# Altium PCB ZYNQ_BOARD.PcbDoc (part 6 of 9)
Units mm, origin at the board's own origin, x right, y up, seen from the top; angles counter-clockwise.
Board outline 120 x 66 mm, 10 copper layers (Top Layer, Internal Plane 1 (GND), Middle Layer 1, Middle Layer 2, Internal Plane 2 (+1.0V), Middle Layer 3, Middle Layer 4, Middle Layer 5 (PWR), Internal Plane 3 (GND), Bottom Layer), stack 0.982 mm thick; 333 components, 331 nets, 1511 pads, 1077 vias.
Unrouted connection lines stored in the file: 30.
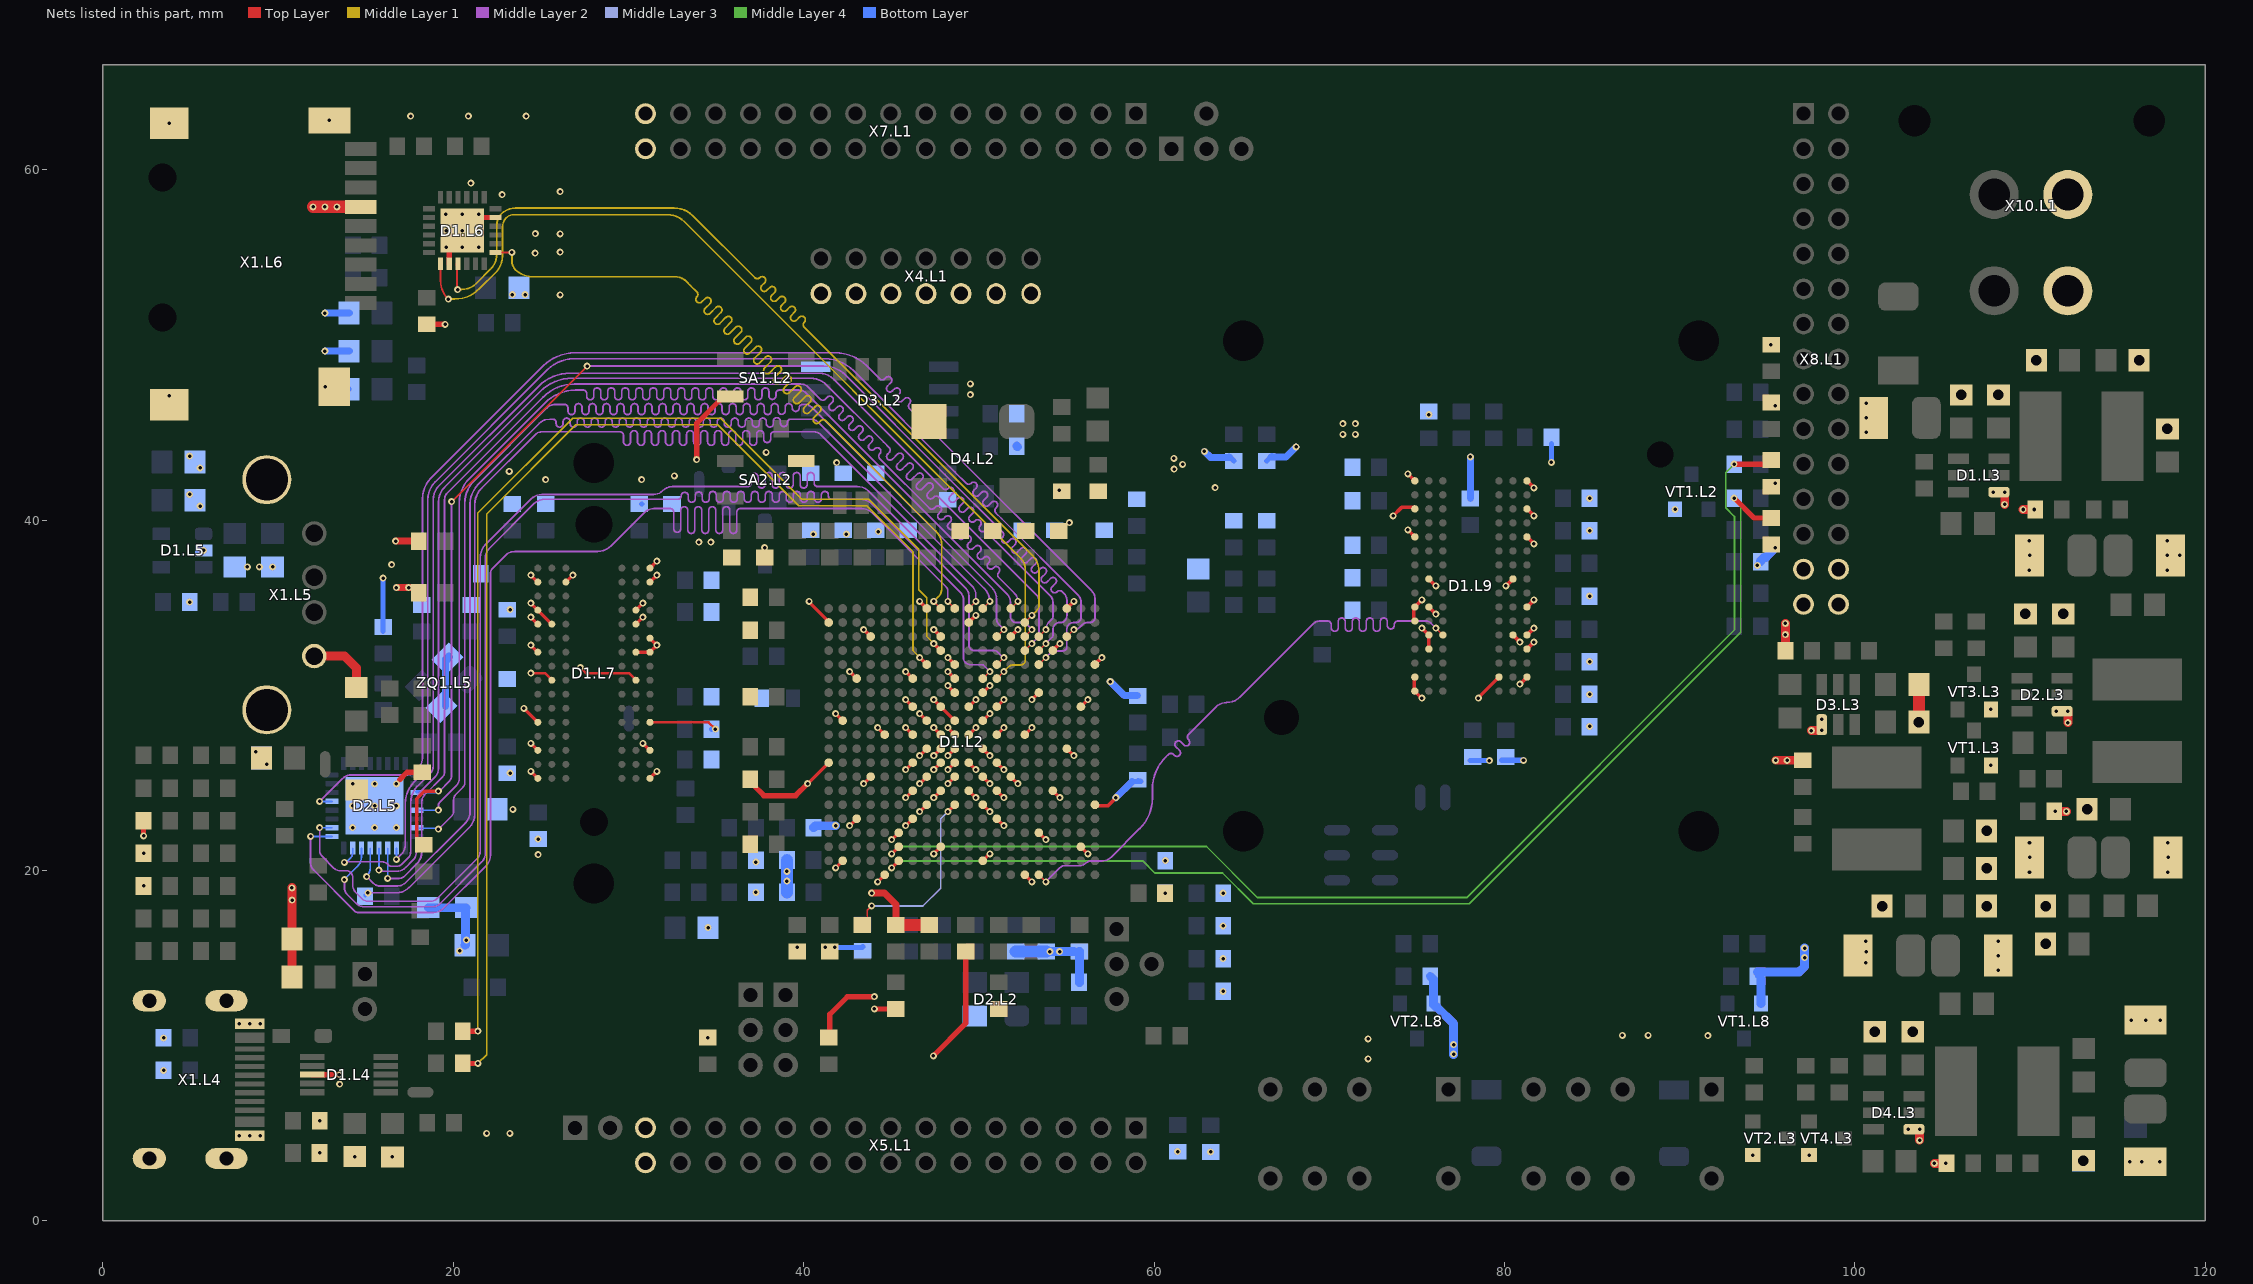
[diagram p14: the nets of this part, all layers, seen from the top]

## Via types
v1: diameter 0.4, hole 0.2, Top Layer to Bottom Layer, 1059 vias
v2: diameter 0.9, hole 0.6, Top Layer to Bottom Layer, 18 vias

## Nets (pads, with @x,y where several pads share a name; then routed paths per layer and width w, separated by ;. In a path a pad name is that pad's centre, name@x,y a point inside that pad or via, vN(x,y) a via of type N, cw(c..) or ccw(c..) an arc to the next point about the centre after c; other vN are vias at no path point) (continued)
FPGA_SD_CARD.SD_D1: D1.L2.A9 D1.L6.7 | length 54.1
  Top Layer w0.1: D1.L6.7@22.41,55.28 v1(23.34,55.28) ; v1(47.42,35.36) D1.L2.A9@47.82,34.96
  Middle Layer 1 w0.1: 23.34,54.774 ccw(c24.008,54.774) 23.536,54.302 ccw(c24.507,55.274) 24.507,53.9 32.626,53.9 cw(c32.626,52.925) 33.316,53.614 33.316,53.614 33.539,53.391 33.9,53.03 cw(c33.759,52.889) 33.9,52.747 ccw(c34.041,52.606) 33.9,52.464 ccw(c34.041,52.606) 34.183,52.464 34.371,52.652 cw(c34.512,52.511) 34.654,52.652 cw(c34.512,52.511) 34.654,52.369 34.372,52.087 ccw(c34.513,51.946) 34.372,51.804 ccw(c34.513,51.946) 34.654,51.804 34.991,52.141 cw(c35.133,52) 35.274,52.141 cw(c35.133,52) 35.274,51.859 34.937,51.522 ccw(c35.079,51.38) 34.937,51.239 ccw(c35.079,51.38) 35.22,51.239 35.557,51.576 cw(c35.699,51.434) 35.84,51.576 cw(c35.699,51.434) 35.84,51.293 35.503,50.956 ccw(c35.644,50.815) 35.503,50.673 ccw(c35.644,50.815) 35.786,50.673 36.123,51.01 cw(c36.264,50.869) 36.406,51.01 cw(c36.264,50.869) 36.406,50.727 36.069,50.39 ccw(c36.21,50.249) 36.069,50.107 ccw(c36.21,50.249) 36.352,50.107 36.689,50.444 cw(c36.83,50.303) 36.971,50.444 cw(c36.83,50.303) 36.971,50.162 36.634,49.825 ccw(c36.776,49.683) 36.634,49.542 ccw(c36.776,49.683) 36.917,49.542 37.254,49.879 cw(c37.396,49.737) 37.537,49.879 cw(c37.396,49.737) 37.537,49.596 37.2,49.259 ccw(c37.341,49.117) 37.2,48.976 ccw(c37.341,49.117) 37.483,48.976 37.82,49.313 cw(c37.961,49.172) 38.103,49.313 cw(c37.961,49.172) 38.103,49.03 37.766,48.693 ccw(c37.907,48.552) 37.766,48.41 ccw(c37.907,48.552) 38.049,48.41 38.386,48.747 cw(c38.527,48.606) 38.668,48.747 cw(c38.527,48.606) 38.668,48.465 38.331,48.128 ccw(c38.473,47.986) 38.331,47.845 ccw(c38.473,47.986) 38.614,47.845 38.951,48.182 cw(c39.093,48.04) 39.234,48.182 cw(c39.093,48.04) 39.234,47.899 38.897,47.562 ccw(c39.039,47.42) 38.897,47.279 ccw(c39.039,47.42) 39.18,47.279 39.517,47.616 cw(c39.658,47.475) 39.8,47.616 cw(c39.658,47.475) 39.8,47.333 39.463,46.996 ccw(c39.604,46.855) 39.463,46.713 ccw(c39.604,46.855) 39.746,46.713 40.083,47.05 cw(c40.224,46.909) 40.365,47.05 cw(c40.224,46.909) 40.365,46.767 40.028,46.43 ccw(c40.17,46.289) 40.028,46.148 ccw(c40.17,46.289) 40.311,46.148 40.648,46.485 cw(c40.79,46.343) 40.931,46.485 cw(c40.79,46.343) 40.931,46.202 40.594,45.865 ccw(c40.736,45.723) 40.594,45.582 ccw(c40.736,45.723) 40.877,45.582 40.971,45.676 cw(c41.113,45.535) 41.254,45.676 41.289,45.641 47.545,39.385 cw(c46.76,38.6) 47.87,38.6 47.87,36.07 cw(c47.242,36.07) 47.686,35.626 v1(47.42,35.36) ; 23.34,54.775 v1(23.34,55.28)
FPGA_SD_CARD.SD_D2: D1.L2.F13 D1.L6.1 | length 54.2
  Top Layer w0.1: D1.L6.1@19.26,54.63 19.26,53.706 ccw(c20.796,53.706) v1(19.71,52.62) ; D1.L2.F13@51.02,30.96 v1(51.42,31.36)
  Top Layer w0.2: D1.L6.1@19.26,54.63 D1.L6.1@19.26,54.74
  Middle Layer 1 w0.1: v1(19.71,52.62) 20.071,52.62 ccw(c20.071,54.613) 21.481,53.204 22.471,54.195 ccw(c21.451,55.092) 22.81,55.092 22.81,56.753 cw(c23.527,56.753) 23.02,57.26 cw(c23.446,56.834) 23.446,57.437 32.234,57.437 cw(c32.234,56.11) 33.172,57.048 33.173,57.047 52.39,37.83 cw(c51.786,37.226) 52.64,37.226 52.64,31.989 cw(c52.401,31.989) 52.57,31.82 cw(c52.377,32.013) 52.377,31.74 51.92,31.74 ccw(c51.92,31.45) 51.715,31.655 v1(51.42,31.36)
FPGA_SD_CARD.SD_D3: D1.L2.B15 D1.L6.3 | length 54.1
  Top Layer w0.1: v1@20.21,53.163 D1.L6.3@20.21,54.58 ; D1.L2.B15@52.62,34.16 v1(53.02,34.56)
  Top Layer w0.2: D1.L6.3@20.21,54.58 D1.L6.3@20.26,54.63
  Middle Layer 1 w0.1: v1(20.24,53.163) 20.461,53.163 ; 20.462,53.163 ccw(c20.462,54.373) 21.318,53.518 22.112,54.312 ccw(c21.229,55.198) 22.48,55.198 ; 22.48,55.199 22.48,56.838 cw(c23.4,56.838) 22.749,57.488 cw(c23.55,56.688) 23.55,57.82 ; 23.551,57.82 32.598,57.82 cw(c32.598,56.3) 33.673,57.375 33.674,57.374 37.168,53.88 37.204,53.844 ccw(c37.345,53.986) 37.486,53.844 37.488,53.846 cw(c37.629,53.705) 37.771,53.846 cw(c37.629,53.705) 37.771,53.563 37.605,53.397 ccw(c37.746,53.256) 37.605,53.114 ccw(c37.746,53.256) 37.888,53.114 38.054,53.28 cw(c38.195,53.139) 38.337,53.28 cw(c38.195,53.139) 38.337,52.997 38.171,52.832 ccw(c38.312,52.69) 38.171,52.549 ccw(c38.312,52.69) 38.454,52.549 38.619,52.715 cw(c38.761,52.573) 38.902,52.715 cw(c38.761,52.573) 38.902,52.432 38.736,52.266 ccw(c38.878,52.124) 38.736,51.983 ccw(c38.878,52.124) 39.019,51.983 39.185,52.149 cw(c39.326,52.007) 39.468,52.149 cw(c39.326,52.007) 39.468,51.866 39.302,51.7 ccw(c39.444,51.559) 39.302,51.417 ccw(c39.444,51.559) 39.585,51.417 39.751,51.583 cw(c39.892,51.442) 40.034,51.583 cw(c39.892,51.442) 40.034,51.3 40.032,51.299 ccw(c40.173,51.157) 40.032,51.016 40.634,50.413 53.043,38.005 cw(c52.107,37.07) 53.43,37.07 53.43,35.17 cw(c52.947,35.17) 53.289,34.829 v1(53.02,34.56)
FPGA_UART.UART_RX: D1.L2.D9 R8.L4.2 | length 67.1
  Top Layer w0.2: v1(47.42,32.96) D1.L2.D9@47.82,32.56
  Top Layer w0.3: R8.L4.2@20.64,10.83 v1(21.398,10.83)
  Middle Layer 1 w0.1: v1(21.398,10.83) 21.398,40.408 26.812,45.823 35.252,45.823 39.886,41.189 43.709,41.189 46.559,38.339 46.559,36.028 47.02,35.567 47.02,33.36 v1(47.42,32.96)
FPGA_UART.UART_TX: D1.L2.E8 R7.L4.2 | length 68.5
  Top Layer w0.2: v1(46.62,32.16) D1.L2.E8@47.02,31.76
  Top Layer w0.3: R7.L4.2@20.64,8.993 v1(21.398,8.993)
  Middle Layer 1 w0.1: v1(21.398,8.993) 21.9,9.495 21.9,40.351 26.995,45.446 35.094,45.446 39.71,40.83 43.595,40.83 46.236,38.19 46.236,32.544 v1(46.62,32.16)
FPGA_USB.USB_HT_CLKO: D1.L2.A11 R5.L5.1 | length 75.6
  Top Layer w0.1: D1.L2.A11@49.42,34.96 v1(49.82,35.36)
  Middle Layer 2 w0.1: v1(15.12,18.73) 16.741,18.73 ; 16.742,18.73 ccw(c16.742,19.776) 17.482,19.037 20.93,22.485 ccw(c20.235,23.183) 21.22,23.183 21.22,40.893 cw(c22.517,40.893) 21.6,41.81 24.673,44.883 cw(c25.062,44.495) 25.062,45.044 29.062,45.044 29.512,45.044 cw(c29.512,44.844) 29.712,44.844 29.712,44.472 ccw(c29.912,44.472) 30.112,44.472 30.112,44.911 cw(c30.312,44.911) 30.512,44.911 30.512,44.472 ccw(c30.712,44.472) 30.912,44.472 30.912,44.911 cw(c31.112,44.911) 31.312,44.911 31.312,44.472 ccw(c31.512,44.472) 31.712,44.472 31.712,44.911 cw(c31.912,44.911) 32.112,44.911 32.112,44.472 ccw(c32.312,44.472) 32.512,44.472 32.512,44.911 cw(c32.712,44.911) 32.912,44.911 32.912,44.472 ccw(c33.112,44.472) 33.312,44.472 33.312,44.911 cw(c33.512,44.911) 33.712,44.911 33.712,44.472 ccw(c33.912,44.472) 34.112,44.472 34.112,44.911 cw(c34.312,44.911) 34.512,44.911 34.512,44.472 ccw(c34.712,44.472) 34.912,44.472 34.912,44.911 cw(c35.112,44.911) 35.312,44.911 35.312,44.472 ccw(c35.512,44.472) 35.712,44.472 35.712,44.911 cw(c35.912,44.911) 36.112,44.911 36.112,44.472 ccw(c36.312,44.472) 36.512,44.472 36.512,44.911 cw(c36.712,44.911) 36.912,44.911 36.912,44.472 ccw(c37.112,44.472) 37.312,44.472 37.312,44.911 cw(c37.512,44.911) 37.712,44.911 37.712,44.631 ccw(c37.912,44.631) 38.112,44.631 38.112,44.844 cw(c38.312,44.844) 38.312,45.044 38.945,45.044 40.572,45.044 cw(c40.573,44.469) 40.979,44.876 ; v1(49.82,35.36) 49.82,35.716 ccw(c49.049,35.716) 49.594,36.261 40.98,44.875 ; 40.979,44.876 40.98,44.875
  Bottom Layer w0.2: R5.L5.1@14.98,18.57 R5.L5.1@14.98,18.62
FPGA_USB.USB_HT_D0: D1.L2.A14 D2.L5.3 | length 75.8
  Top Layer w0.1: D1.L2.A14@51.82,34.96 v1(52.22,35.36)
  Middle Layer 2 w0.1: v1(16.25,19.55) 16.896,19.55 ; 16.897,19.55 ccw(c16.897,19.993) 17.21,19.68 17.912,20.382 ccw(c17.218,21.075) 18.199,21.075 18.199,23.939 cw(c18.728,23.939) 18.354,24.313 19.391,25.35 ccw(c19.128,25.612) 19.499,25.612 19.499,41.174 ; 19.499,41.175 cw(c20.062,41.175) 19.665,41.573 25.121,47.029 cw(c26.917,45.233) 26.917,47.773 39.833,47.773 cw(c39.833,47.175) 40.256,47.598 40.257,47.597 40.912,46.942 40.948,46.907 ccw(c41.089,47.048) 41.23,46.907 41.348,47.024 cw(c41.489,46.883) 41.631,47.024 cw(c41.489,46.883) 41.631,46.741 41.489,46.599 ccw(c41.63,46.458) 41.489,46.316 ccw(c41.63,46.458) 41.771,46.316 41.914,46.459 cw(c42.055,46.317) 42.197,46.459 cw(c42.055,46.317) 42.197,46.176 42.054,46.033 ccw(c42.196,45.892) 42.054,45.75 ccw(c42.196,45.892) 42.337,45.75 42.479,45.893 cw(c42.621,45.751) 42.762,45.893 cw(c42.621,45.751) 42.762,45.61 42.62,45.468 ccw(c42.761,45.326) 42.62,45.185 ccw(c42.761,45.326) 42.903,45.185 43.045,45.327 cw(c43.187,45.186) 43.328,45.327 cw(c43.187,45.186) 43.328,45.044 43.186,44.902 ccw(c43.327,44.761) 43.186,44.619 ccw(c43.327,44.761) 43.468,44.619 43.593,44.744 cw(c43.735,44.602) 43.876,44.744 cw(c43.735,44.602) 43.876,44.461 43.751,44.336 ccw(c43.893,44.195) 43.751,44.053 ccw(c43.893,44.195) 44.034,44.053 44.059,44.078 cw(c44.2,43.937) 44.342,44.078 cw(c44.2,43.937) 44.342,43.795 ccw(c44.483,43.654) 44.342,43.512 44.546,43.308 47.13,40.724 47.165,40.689 ccw(c47.307,40.83) 47.448,40.689 47.519,40.76 cw(c47.66,40.618) 47.802,40.76 cw(c47.66,40.618) 47.802,40.477 47.702,40.377 ccw(c47.844,40.236) 47.702,40.094 ccw(c47.844,40.236) 47.985,40.094 48.085,40.194 cw(c48.226,40.053) 48.368,40.194 cw(c48.226,40.053) 48.368,39.911 48.268,39.811 ccw(c48.409,39.67) 48.268,39.529 ccw(c48.409,39.67) 48.551,39.529 48.65,39.628 cw(c48.792,39.487) 48.933,39.628 cw(c48.792,39.487) 48.933,39.345 48.834,39.246 ccw(c48.975,39.104) 48.834,38.963 ccw(c48.975,39.104) 49.116,38.963 49.216,39.063 cw(c49.357,38.921) 49.499,39.063 cw(c49.357,38.921) 49.499,38.78 49.399,38.68 ccw(c49.541,38.539) 49.399,38.397 ccw(c49.541,38.539) 49.682,38.397 49.782,38.497 cw(c49.923,38.355) 50.065,38.497 cw(c49.923,38.355) 50.065,38.214 49.965,38.114 ccw(c50.106,37.973) 49.965,37.832 ccw(c50.106,37.973) 50.248,37.832 50.281,37.865 cw(c50.423,37.724) 50.564,37.865 cw(c50.423,37.724) 50.564,37.582 50.531,37.549 ccw(c50.672,37.407) 50.531,37.266 ccw(c50.672,37.407) 50.813,37.266 50.842,37.295 cw(c50.984,37.153) 51.125,37.295 cw(c50.984,37.153) 51.125,37.012 ccw(c51.267,36.87) 51.125,36.729 51.687,36.168 52.026,35.828 cw(c51.558,35.36) v1(52.22,35.36)
  Bottom Layer w0.1: v1(16.25,19.55) D2.L5.3@16.25,21.28
FPGA_USB.USB_HT_D1: D1.L2.D15 D2.L5.4 | length 75.7
  Top Layer w0.1: D1.L2.D15@52.62,32.56 v1(53.02,32.96)
  Middle Layer 2 w0.1: v1@15.74,19.96 16.764,19.96 ; 16.765,19.96 ccw(c16.764,20.675) 17.27,20.17 17.691,20.591 ; 17.691,20.591 ccw(c17.207,21.075) 17.892,21.075 17.892,23.893 cw(c18.842,23.893) 18.17,24.565 18.958,25.354 ccw(c18.502,25.81) 19.147,25.81 19.147,41.039 cw(c20.335,41.039) 19.495,41.879 24.976,47.359 cw(c26.772,45.563) 26.772,48.103 40.394,48.103 cw(c40.394,46.84) 41.288,47.733 44.557,44.463 44.876,44.145 cw(c44.734,44.004) 44.876,43.862 44.787,43.774 ccw(c44.929,43.632) 44.787,43.491 ccw(c44.929,43.632) 45.07,43.491 45.346,43.767 cw(c45.488,43.626) 45.629,43.767 cw(c45.488,43.626) 45.629,43.484 45.353,43.208 ccw(c45.494,43.067) 45.353,42.925 ccw(c45.494,43.067) 45.636,42.925 45.912,43.202 cw(c46.053,43.06) 46.195,43.202 cw(c46.053,43.06) 46.195,42.919 45.918,42.642 ccw(c46.06,42.501) 45.918,42.359 ccw(c46.06,42.501) 46.201,42.359 46.478,42.636 cw(c46.619,42.494) 46.761,42.636 cw(c46.619,42.494) 46.761,42.353 46.484,42.077 ccw(c46.626,41.935) 46.484,41.794 ccw(c46.626,41.935) 46.767,41.794 47.043,42.07 cw(c47.185,41.929) 47.326,42.07 cw(c47.185,41.929) 47.326,41.787 47.095,41.556 ccw(c47.236,41.415) 47.095,41.273 ccw(c47.236,41.415) 47.378,41.273 47.421,41.317 cw(c47.563,41.175) 47.704,41.317 48.161,40.859 53.272,35.749 cw(c52.909,35.385) 53.423,35.385 53.423,33.563 cw(c52.94,33.563) 53.282,33.222 v1(53.02,32.96)
  Bottom Layer w0.1: v1(15.75,20.03) D2.L5.4@15.75,21.28
FPGA_USB.USB_HT_D2: D1.L2.A12 D2.L5.5 | length 75.8
  Top Layer w0.1: D1.L2.A12@50.22,34.96 v1(50.62,35.36)
  Middle Layer 2 w0.1: v1(15.05,19.66) 15.427,19.283 ccw(c15.82,19.675) 15.82,19.12 16.813,19.12 ccw(c16.813,19.764) 17.268,19.309 20.699,22.739 ccw(c20.082,23.356) 20.955,23.356 20.955,40.94 cw(c22.48,40.94) 21.401,42.019 24.904,45.521 cw(c25.499,44.928) 25.214,45.718 cw(c25.499,44.928) 25.264,45.735 25.499,45.768 25.664,45.768 cw(c25.664,45.568) 25.864,45.568 25.864,45.511 ccw(c26.064,45.511) 26.264,45.511 26.264,45.627 cw(c26.464,45.627) 26.664,45.627 26.664,45.511 ccw(c26.864,45.511) 27.064,45.511 27.064,45.627 cw(c27.264,45.627) 27.464,45.627 27.464,45.511 ccw(c27.664,45.511) 27.864,45.511 27.864,45.627 cw(c28.064,45.627) 28.264,45.627 28.264,45.511 ccw(c28.464,45.511) 28.664,45.511 28.664,45.627 cw(c28.864,45.627) 29.064,45.627 29.064,45.511 ccw(c29.264,45.511) 29.464,45.511 29.464,45.627 cw(c29.664,45.627) 29.864,45.627 29.864,45.511 ccw(c30.064,45.511) 30.264,45.511 30.264,45.627 cw(c30.464,45.627) 30.664,45.627 30.664,45.511 ccw(c30.864,45.511) 31.064,45.511 31.064,45.627 cw(c31.264,45.627) 31.464,45.627 31.464,45.511 ccw(c31.664,45.511) 31.864,45.511 31.864,45.627 cw(c32.064,45.627) 32.264,45.627 32.264,45.511 ccw(c32.464,45.511) 32.664,45.511 32.664,45.627 cw(c32.864,45.627) 33.064,45.627 33.064,45.511 ccw(c33.264,45.511) 33.464,45.511 33.464,45.627 cw(c33.664,45.627) 33.864,45.627 33.864,45.511 ccw(c34.064,45.511) 34.264,45.511 34.264,45.627 cw(c34.464,45.627) 34.664,45.627 34.664,45.511 ccw(c34.864,45.511) 35.064,45.511 35.064,45.627 cw(c35.264,45.627) 35.464,45.627 35.464,45.511 ccw(c35.664,45.511) 35.864,45.511 35.864,45.627 cw(c36.064,45.627) 36.264,45.627 36.264,45.511 ccw(c36.464,45.511) 36.664,45.511 36.664,45.627 cw(c36.864,45.627) 37.064,45.627 37.064,45.511 ccw(c37.264,45.511) 37.464,45.511 37.464,45.628 cw(c37.664,45.628) 37.864,45.628 37.864,45.511 ccw(c38.064,45.511) 38.264,45.511 38.264,45.652 cw(c38.464,45.652) 38.664,45.652 38.664,45.545 ccw(c38.864,45.545) 39.064,45.545 39.064,45.568 cw(c39.264,45.568) 39.264,45.768 40.383,45.768 40.458,45.764 cw(c40.383,45.143) 40.508,45.755 cw(c40.383,45.143) 40.518,45.753 cw(c40.383,45.143) 40.825,45.585 40.826,45.584 50.316,36.094 cw(c49.582,35.36) v1(50.62,35.36)
  Bottom Layer w0.1: v1(15.05,19.66) ccw(c14.567,20.143) 15.25,20.143 D2.L5.5@15.25,21.28
FPGA_USB.USB_HT_D3: D1.L2.F12 D2.L5.6 | length 75.8
  Top Layer w0.1: D1.L2.F12@50.22,30.96 v1(50.62,31.36)
  Middle Layer 2 w0.1: v1(13.78,19.49) 13.78,19.037 ccw(c14.352,19.037) 13.947,18.633 14.456,18.124 ccw(c14.9,18.569) 14.9,17.94 18.89,17.94 ccw(c18.89,18.36) 19.187,18.063 21.621,20.497 ccw(c21.132,20.986) 21.823,20.986 21.823,37.814 cw(c22.665,37.815) 22.07,38.41 24.588,40.928 cw(c25.217,40.301) 25.217,41.189 30.141,41.189 32.805,41.189 ccw(c32.805,41.389) 33.005,41.389 cw(c33.205,41.389) 33.405,41.389 33.405,41.226 ccw(c33.605,41.226) 33.805,41.226 33.805,41.415 cw(c34.005,41.415) 34.205,41.415 34.205,41.226 ccw(c34.405,41.226) 34.605,41.226 34.605,41.444 cw(c34.805,41.444) 35.005,41.444 35.005,41.226 ccw(c35.205,41.226) 35.405,41.226 35.405,41.444 cw(c35.605,41.444) 35.805,41.444 35.805,41.226 ccw(c36.005,41.226) 36.205,41.226 36.205,41.444 cw(c36.405,41.444) 36.605,41.444 36.605,41.226 ccw(c36.805,41.226) 37.005,41.226 37.005,41.444 cw(c37.205,41.444) 37.405,41.444 37.405,41.226 ccw(c37.605,41.226) 37.805,41.226 37.805,41.444 cw(c38.005,41.444) 38.205,41.444 38.205,41.226 ccw(c38.405,41.226) 38.605,41.226 38.605,41.444 cw(c38.805,41.444) 39.005,41.444 39.005,41.226 ccw(c39.205,41.226) 39.405,41.226 39.405,41.444 cw(c39.605,41.444) 39.805,41.444 39.805,41.226 ccw(c40.005,41.226) 40.205,41.226 40.205,41.444 cw(c40.405,41.444) 40.605,41.444 40.605,41.226 ccw(c40.805,41.226) 41.005,41.226 41.005,41.444 cw(c41.205,41.444) 41.405,41.444 41.405,41.389 ccw(c41.605,41.389) 41.605,41.189 42.055,41.189 43.198,41.189 ; 43.199,41.189 cw(c43.199,40.134) 43.945,40.88 43.946,40.879 48.932,35.893 48.933,35.892 cw(c48.482,35.441) 49.12,35.441 ; 49.12,35.44 49.12,32.13 ccw(c49.484,32.13) 49.226,31.873 ccw(c49.515,32.163) 49.515,31.754 50.18,31.754 cw(c50.18,31.642) 50.259,31.721 v1(50.62,31.36)
  Bottom Layer w0.1: v1(13.78,19.49) 14.527,20.237 ccw(c13.987,20.776) 14.75,20.776 D2.L5.6@14.75,21.28
FPGA_USB.USB_HT_D4: D1.L2.C16 D2.L5.7 | length 75.7
  Top Layer w0.1: D1.L2.C16@53.42,33.36 v1(53.82,33.76)
  Middle Layer 2 w0.1: v1@13.804,20.468 cw(c13.882,20.389) 13.882,20.5 15.943,20.5 cw(c15.943,20.066) 16.25,20.373 16.32,20.303 ccw(c16.461,20.445) 16.461,20.245 16.75,20.245 ccw(c16.75,20.719) 17.086,20.384 17.405,20.703 ccw(c17.018,21.09) 17.565,21.09 17.565,23.881 cw(c18.879,23.881) 17.95,24.81 18.676,25.536 ccw(c18.263,25.949) 18.847,25.949 18.847,41.17 cw(c19.95,41.17) 19.17,41.95 24.866,47.646 cw(c26.662,45.85) 26.662,48.39 40.884,48.39 cw(c40.884,47.232) 41.702,48.051 47.91,41.843 47.946,41.808 ccw(c48.087,41.949) 48.228,41.808 48.232,41.811 cw(c48.373,41.67) 48.515,41.811 cw(c48.373,41.67) 48.515,41.528 48.349,41.362 ccw(c48.49,41.221) 48.349,41.08 ccw(c48.49,41.221) 48.632,41.08 48.798,41.245 cw(c48.939,41.104) 49.08,41.245 cw(c48.939,41.104) 49.08,40.963 48.915,40.797 ccw(c49.056,40.655) 48.915,40.514 ccw(c49.056,40.655) 49.197,40.514 49.363,40.68 cw(c49.505,40.538) 49.646,40.68 cw(c49.505,40.538) 49.646,40.397 49.48,40.231 ccw(c49.622,40.09) 49.48,39.948 ccw(c49.622,40.09) 49.763,39.948 49.784,39.969 cw(c49.926,39.828) 50.067,39.969 cw(c49.926,39.828) 50.067,39.687 ccw(c50.208,39.545) 50.067,39.403 ccw(c50.208,39.545) 50.35,39.403 50.491,39.545 cw(c50.633,39.404) 50.774,39.545 cw(c50.633,39.404) 50.774,39.262 ccw(c50.915,39.121) 50.774,38.979 51.101,38.653 54.089,35.664 cw(c53.765,35.34) 54.223,35.34 54.223,34.521 cw(c53.945,34.521) 54.142,34.325 53.982,34.165 ccw(c54.296,33.852) v1@53.853,33.852
  Bottom Layer w0.1: v1@13.78,20.45 ccw(c13.78,20.635) 13.911,20.504 14.138,20.731 ccw(c13.867,21.002) 14.25,21.002 D2.L5.7@14.25,21.28
  other v1: 13.78,20.47
FPGA_USB.USB_HT_D5: D1.L2.A10 D2.L5.9 | length 75.8
  Top Layer w0.1: v1(48.22,35.36) D1.L2.A10@48.62,34.96
  Middle Layer 2 w0.1: 11.85,20.446 ccw(c12.424,20.446) 12.018,20.04 12.019,20.039 14.374,17.684 ccw(c14.559,17.868) 14.559,17.608 18.884,17.608 ccw(c18.884,18.382) 19.432,17.834 21.846,20.249 ccw(c21.191,20.903) 22.117,20.903 22.117,36.952 cw(c22.538,36.952) 22.24,37.25 22.994,38.004 cw(c23.501,37.497) 23.501,38.214 ; 11.85,20.447 v1(11.85,21.95) ; 23.502,38.214 28.226,38.214 ccw(c28.226,39.322) 29.01,38.539 30.919,40.447 cw(c31.449,39.918) 31.449,40.667 31.935,40.667 32.379,40.667 cw(c32.379,40.467) 32.579,40.467 32.579,39.506 ccw(c32.779,39.506) 32.979,39.506 32.979,40.569 cw(c33.179,40.569) 33.379,40.569 33.379,39.442 ccw(c33.579,39.442) 33.779,39.442 33.779,40.569 cw(c33.979,40.569) 34.179,40.569 34.179,39.442 ccw(c34.379,39.442) 34.579,39.442 34.579,40.569 cw(c34.779,40.569) 34.979,40.569 34.979,39.442 ccw(c35.179,39.442) 35.379,39.442 35.379,40.569 cw(c35.579,40.569) 35.779,40.569 35.779,39.442 ccw(c35.979,39.442) 36.179,39.442 36.179,40.467 cw(c36.379,40.467) 36.379,40.667 36.429,40.667 43.297,40.667 cw(c43.297,39.809) 43.904,40.416 43.905,40.415 48.119,36.201 48.12,36.2 cw(c47.878,35.958) 48.22,35.958 ; v1(48.22,35.36) 48.22,35.957
  Bottom Layer w0.1: v1(11.85,21.95) D2.L5.9@13.08,21.95
FPGA_USB.USB_HT_D6: D1.L2.E13 D2.L5.10 | length 75.8
  Top Layer w0.1: D1.L2.E13@51.02,31.76 v1(51.42,32.16)
  Middle Layer 2 w0.1: 12.37,21.146 ccw(c12.842,21.146) 12.508,20.812 12.509,20.811 13.178,20.142 ; 12.37,21.147 v1(12.37,22.45) ; 13.179,20.141 ccw(c13.542,20.503) 13.542,19.991 ; 13.543,19.991 13.892,19.991 cw(c13.892,19.642) 14.139,19.889 cw(c13.857,19.607) 14.255,19.607 14.255,19.202 ccw(c14.938,19.202) 14.455,18.719 14.784,18.391 ccw(c15.124,18.73) 15.124,18.25 18.702,18.25 ; 18.703,18.25 ccw(c18.703,18.766) 19.068,18.402 21.376,20.71 ccw(c20.996,21.09) 21.534,21.09 21.534,37.863 cw(c22.616,37.863) 21.85,38.628 24.428,41.205 cw(c25.062,40.571) 25.062,41.468 31.445,41.468 ccw(c31.445,42.169) 31.941,41.673 cw(c32.535,41.079) 32.449,41.915 cw(c32.535,41.079) 32.535,41.92 35.815,41.92 36.796,41.92 ccw(c36.796,42.12) 36.996,42.12 36.996,42.474 cw(c37.196,42.474) 37.396,42.474 37.396,42.034 ccw(c37.596,42.034) 37.796,42.034 37.796,42.52 cw(c37.996,42.52) 38.196,42.52 38.196,42.034 ccw(c38.396,42.034) 38.596,42.034 38.596,42.52 cw(c38.796,42.52) 38.996,42.52 38.996,42.034 ccw(c39.196,42.034) 39.396,42.034 39.396,42.52 cw(c39.596,42.52) 39.796,42.52 39.796,42.034 ccw(c39.996,42.034) 40.196,42.034 40.196,42.52 cw(c40.396,42.52) 40.596,42.52 40.596,42.12 ccw(c40.796,42.12) 40.796,41.92 41.246,41.92 43.053,41.92 cw(c43.053,40.978) 43.718,41.644 44.201,41.161 44.202,41.161 49.245,36.117 cw(c48.797,35.67) 49.43,35.67 49.43,32.847 49.43,32.843 ccw(c49.74,32.869) 49.74,32.558 ; 49.741,32.558 50.869,32.558 cw(c50.869,32.259) 51.08,32.47 51.369,32.181 ccw(c51.42,32.232) v1(51.42,32.16)
  Bottom Layer w0.1: v1(12.37,22.45) D2.L5.10@13.08,22.45
FPGA_USB.USB_HT_D7: D1.L2.C18 D2.L5.13 | length 75.8
  Top Layer w0.1: D1.L2.C18@55.02,33.36 v1(55.42,33.76)
  Middle Layer 2 w0.1: v1(12.37,23.95) 13.654,25.234 cw(c14.2,24.689) 14.2,25.46 17.365,25.46 ccw(c17.365,26.056) 17.785,25.635 17.975,25.824 ccw(c17.347,26.453) 18.235,26.453 18.235,41.229 cw(c19.874,41.229) 18.715,42.388 25.139,48.812 cw(c26.935,47.016) 26.935,49.556 41.795,49.556 ; 41.796,49.556 cw(c41.796,47.01) 43.596,48.81 44.303,48.103 44.338,48.068 ccw(c44.48,48.209) 44.621,48.068 44.69,48.137 cw(c44.831,47.995) 44.973,48.137 cw(c44.831,47.995) 44.973,47.854 44.779,47.66 ccw(c44.921,47.519) 44.779,47.378 ccw(c44.921,47.519) 45.062,47.378 45.173,47.488 cw(c45.314,47.347) 45.456,47.488 cw(c45.314,47.347) 45.456,47.206 45.345,47.095 ccw(c45.486,46.953) 45.345,46.812 ccw(c45.486,46.953) 45.628,46.812 45.752,46.936 cw(c45.894,46.795) 46.035,46.936 cw(c45.894,46.795) 46.035,46.654 ccw(c46.177,46.512) 46.035,46.371 47.665,44.741 56.443,35.963 56.444,35.962 cw(c56.013,35.531) 56.622,35.531 ; v1(55.42,33.76) ccw(c55.42,34.266) 55.778,33.909 55.926,34.057 cw(c56.16,33.823) 56.16,34.154 56.323,34.154 ccw(c56.323,34.463) 56.541,34.243 ccw(c56.348,34.439) 56.622,34.439 56.622,35.53
  Bottom Layer w0.1: v1(12.37,23.95) D2.L5.13@13.08,23.95
FPGA_USB.USB_HT_DIR: D1.L2.C13 D2.L5.31 | length 75.7
  Top Layer w0.1: D1.L2.C13@51.02,33.36 v1(51.42,33.76)
  Middle Layer 2 w0.1: v1(19.15,22.36) 19.895,23.105 ccw(c19.613,23.386) 20.011,23.386 20.011,24.025 cw(c20.485,24.025) 20.15,24.36 20.547,24.757 ccw(c20.295,25.009) 20.652,25.009 20.652,40.961 cw(c22.475,40.961) 21.186,42.25 25.34,46.404 cw(c25.835,45.91) 25.835,46.609 25.891,46.609 26.341,46.609 cw(c26.341,46.409) 26.541,46.409 26.541,46.227 ccw(c26.741,46.227) 26.941,46.227 26.941,46.456 cw(c27.141,46.456) 27.341,46.456 27.341,46.227 ccw(c27.541,46.227) 27.741,46.227 27.741,46.456 cw(c27.941,46.456) 28.141,46.456 28.141,46.227 ccw(c28.341,46.227) 28.541,46.227 28.541,46.456 cw(c28.741,46.456) 28.941,46.456 28.941,46.227 ccw(c29.141,46.227) 29.341,46.227 29.341,46.456 cw(c29.541,46.456) 29.741,46.456 29.741,46.227 ccw(c29.941,46.227) 30.141,46.227 30.141,46.456 cw(c30.341,46.456) 30.541,46.456 30.541,46.227 ccw(c30.741,46.227) 30.941,46.227 30.941,46.456 cw(c31.141,46.456) 31.341,46.456 31.341,46.227 ccw(c31.541,46.227) 31.741,46.227 31.741,46.456 cw(c31.941,46.456) 32.141,46.456 32.141,46.227 ccw(c32.341,46.227) 32.541,46.227 32.541,46.456 cw(c32.741,46.456) 32.941,46.456 32.941,46.227 ccw(c33.141,46.227) 33.341,46.227 33.341,46.456 cw(c33.541,46.456) 33.741,46.456 33.741,46.227 ccw(c33.941,46.227) 34.141,46.227 34.141,46.456 cw(c34.341,46.456) 34.541,46.456 34.541,46.227 ccw(c34.741,46.227) 34.941,46.227 34.941,46.456 cw(c35.141,46.456) 35.341,46.456 35.341,46.227 ccw(c35.541,46.227) 35.741,46.227 35.741,46.456 cw(c35.941,46.456) 36.141,46.456 36.141,46.227 ccw(c36.341,46.227) 36.541,46.227 36.541,46.456 cw(c36.741,46.456) 36.941,46.456 36.941,46.227 ccw(c37.141,46.227) 37.341,46.227 37.341,46.456 cw(c37.541,46.456) 37.741,46.456 37.741,46.227 ccw(c37.941,46.227) 38.141,46.227 38.141,46.456 cw(c38.341,46.456) 38.541,46.456 38.541,46.247 ccw(c38.741,46.247) 38.941,46.247 38.941,46.456 cw(c39.141,46.456) 39.341,46.456 39.341,46.409 ccw(c39.541,46.409) 39.741,46.409 cw(c39.941,46.409) 39.941,46.609 40.086,46.609 40.154,46.604 cw(c40.086,46.14) 40.204,46.594 cw(c40.086,46.14) 40.418,46.472 40.419,46.471 50.73,36.16 cw(c50.063,35.493) 51.006,35.493 51.006,34.381 ccw(c51.507,34.381) 51.153,34.027 v1(51.42,33.76)
  Bottom Layer w0.1: D2.L5.31@17.92,22.41 v1@19.15,22.41
FPGA_USB.USB_HT_nRST: D1.L2.D16 D2.L5.27 R7.L5.1 | length 74.8
  Top Layer w0.1: v1@19.88,41.033 v1@27.637,48.79 ; D1.L2.D16@53.42,32.56 v1(53.82,32.96)
  Top Layer w0.2: R7.L5.1@17.911,21.712 17.911,24.1 18.341,24.53 v1(19.15,24.53)
  Middle Layer 2 w0.1: v1(19.15,24.53) ccw(c19.15,24.651) 19.235,24.565 19.737,25.067 ccw(c19.346,25.459) 19.9,25.459 ; 19.9,25.46 v1(19.9,41.063) ; v1(27.629,48.797) 41.122,48.797 cw(c41.122,46.994) 42.397,48.269 48.064,42.602 51.352,39.315 cw(c51.21,39.173) 51.352,39.032 ccw(c51.493,38.89) 51.352,38.749 ccw(c51.493,38.89) 51.634,38.749 51.776,38.891 cw(c51.917,38.749) 52.059,38.891 cw(c51.917,38.749) 52.059,38.608 51.915,38.464 ccw(c52.057,38.323) 51.915,38.181 ccw(c52.057,38.323) 52.198,38.181 52.385,38.368 cw(c52.526,38.226) 52.667,38.368 cw(c52.526,38.226) 52.667,38.085 52.477,37.894 ccw(c52.618,37.753) 52.477,37.612 ccw(c52.618,37.753) 52.76,37.612 52.95,37.802 cw(c53.092,37.661) 53.233,37.802 cw(c53.092,37.661) 53.233,37.519 53.043,37.329 ccw(c53.184,37.187) 53.043,37.046 ccw(c53.184,37.187) 53.325,37.046 53.516,37.236 cw(c53.657,37.095) 53.799,37.236 cw(c53.657,37.095) 53.799,36.954 53.608,36.763 ccw(c53.75,36.622) 53.608,36.48 ccw(c53.75,36.622) 53.891,36.48 54.082,36.671 cw(c54.223,36.529) 54.364,36.671 cw(c54.223,36.529) 54.364,36.388 54.174,36.197 ccw(c54.315,36.056) 54.174,35.915 ccw(c54.315,36.056) 54.457,35.915 54.463,35.921 cw(c54.604,35.779) 54.746,35.921 54.781,35.885 54.857,35.809 cw(c54.463,35.416) 55.02,35.416 55.02,34.56 cw(c54.581,34.56) 54.892,34.25 54.883,34.241 cw(c54.685,34.439) 54.685,34.159 54.606,34.159 ccw(c54.606,33.792) 54.347,34.053 ccw(c54.634,33.765) 54.227,33.765 54.227,33.445 cw(c54.041,33.445) 54.173,33.313 v1(53.82,32.96)
  Bottom Layer w0.2: D2.L5.27@17.92,24.49 v1@19.15,24.49
FPGA_USB.USB_HT_NXT: D1.L2.E16 D2.L5.2 | length 75.8
  Top Layer w0.1: D1.L2.E16@53.42,31.76 v1(53.82,32.16)
  Middle Layer 2 w0.1: v1(16.75,20.64) 17.032,20.922 ccw(c16.503,21.45) 17.25,21.45 17.25,23.813 cw(c19.024,23.813) 17.77,25.067 18.352,25.649 ccw(c17.894,26.107) 18.542,26.107 18.542,41.174 cw(c19.965,41.174) 18.958,42.18 25.364,48.585 cw(c26.872,47.078) 26.872,49.211 41.194,49.211 cw(c41.194,46.857) 42.858,48.521 48.632,42.747 49.269,42.11 ccw(c49.411,42.251) 49.552,42.11 cw(c49.693,41.968) 49.835,42.11 cw(c49.693,41.968) 49.835,41.827 49.713,41.705 ccw(c49.855,41.564) 49.713,41.423 ccw(c49.855,41.564) 49.996,41.423 50.157,41.584 cw(c50.299,41.442) 50.44,41.584 cw(c50.299,41.442) 50.44,41.301 50.279,41.14 ccw(c50.42,40.998) 50.279,40.857 ccw(c50.42,40.998) 50.562,40.857 50.725,41.02 cw(c50.866,40.879) 51.008,41.02 cw(c50.866,40.879) 51.008,40.737 50.966,40.696 ccw(c51.108,40.554) 50.966,40.413 51.284,40.095 55.667,35.712 cw(c55.274,35.319) 55.83,35.319 55.83,34.43 cw(c55.577,34.43) 55.756,34.252 cw(c55.524,34.484) 55.524,34.155 55.382,34.155 ccw(c55.382,33.797) 55.13,34.051 ccw(c55.403,33.777) 55.016,33.777 55.016,32.747 cw(c54.836,32.747) 54.963,32.619 cw(c54.756,32.826) 54.756,32.533 54.28,32.533 ccw(c54.28,32.324) 54.132,32.472 v1(53.82,32.16)
  Bottom Layer w0.1: v1(16.75,20.64) D2.L5.2@16.75,21.28
  Bottom Layer w0.2: v1@16.75,20.57 v1(16.75,20.64)
FPGA_USB.USB_HT_STP: D1.L2.C15 D2.L5.29 | length 75.8
  Top Layer w0.1: D1.L2.C15@52.62,33.36 v1(53.02,33.76)
  Middle Layer 2 w0.1: v1(19.15,23.45) 19.146,23.454 19.146,23.72 cw(c19.397,23.72) 19.22,23.897 20.167,24.844 ccw(c19.748,25.263) 20.34,25.263 20.34,41.021 ; 20.34,41.022 cw(c22.249,41.022) 20.9,42.373 25.211,46.684 cw(c27.007,44.888) 26.96,47.427 cw(c27.007,44.888) 27.007,47.428 27.01,47.428 27.41,47.428 cw(c27.41,47.228) 27.61,47.228 27.61,47.069 ccw(c27.81,47.069) 28.01,47.069 28.01,47.353 cw(c28.21,47.353) 28.41,47.353 28.41,47.069 ccw(c28.61,47.069) 28.81,47.069 28.81,47.353 cw(c29.01,47.353) 29.21,47.353 29.21,47.069 ccw(c29.41,47.069) 29.61,47.069 29.61,47.353 cw(c29.81,47.353) 30.01,47.353 30.01,47.069 ccw(c30.21,47.069) 30.41,47.069 30.41,47.353 cw(c30.61,47.353) 30.81,47.353 30.81,47.069 ccw(c31.01,47.069) 31.21,47.069 31.21,47.353 cw(c31.41,47.353) 31.61,47.353 31.61,47.069 ccw(c31.81,47.069) 32.01,47.069 32.01,47.353 cw(c32.21,47.353) 32.41,47.353 32.41,47.069 ccw(c32.61,47.069) 32.81,47.069 32.81,47.353 cw(c33.01,47.353) 33.21,47.353 33.21,47.069 ccw(c33.41,47.069) 33.61,47.069 33.61,47.353 cw(c33.81,47.353) 34.01,47.353 34.01,47.069 ccw(c34.21,47.069) 34.41,47.069 34.41,47.353 cw(c34.61,47.353) 34.81,47.353 34.81,47.069 ccw(c35.01,47.069) 35.21,47.069 35.21,47.353 cw(c35.41,47.353) 35.61,47.353 35.61,47.069 ccw(c35.81,47.069) 36.01,47.069 36.01,47.353 cw(c36.21,47.353) 36.41,47.353 36.41,47.069 ccw(c36.61,47.069) 36.81,47.069 36.81,47.353 cw(c37.01,47.353) 37.21,47.353 37.21,47.069 ccw(c37.41,47.069) 37.61,47.069 37.61,47.353 cw(c37.81,47.353) 38.01,47.353 38.01,47.094 ccw(c38.21,47.094) 38.41,47.094 38.41,47.228 cw(c38.61,47.228) 38.61,47.428 39.585,47.428 39.635,47.428 39.724,47.428 cw(c39.724,46.871) 40.117,47.265 40.118,47.264 51.608,35.775 cw(c51.143,35.31) 51.8,35.31 51.8,34.507 ccw(c52.178,34.507) 51.91,34.241 ccw(c52.119,34.449) 52.119,34.154 ; 52.12,34.154 52.49,34.154 cw(c52.49,33.824) 52.723,34.057 v1(53.02,33.76)
  Bottom Layer w0.1: D2.L5.29@17.92,23.45 v1(19.15,23.45)
GND: C1.L2.2 C1.L3.2 C1.L4.2 C1.L5.2 C1.L6.2 C1.L7.2 C1.L9.2 C2.L2.1 C2.L3.2 C2.L4.2 C2.L5.2 C2.L6.2 C2.L7.2 C2.L9.2 C3.L2.1 C3.L3.2 C3.L4.2 C3.L5.2 C3.L6.2 C3.L7.2 C3.L9.2 C4.L2.2 C4.L3.2 C4.L4.2 C4.L5.2 C4.L6.2 C4.L7.2 C4.L9.2 C5.L3.2 C5.L5.2 C5.L7.2 C5.L9.2 C6.L3.2 C6.L5.2 C6.L7.2 C6.L9.2 C7.L2.2 C7.L3.2 C7.L5.2 C7.L7.2 C7.L9.2 C8.L2.2 C8.L3.2 C8.L5.2 C8.L7.2 C8.L9.2 C9.L2.2 C9.L3.2 C9.L5.2 C9.L7.2 C9.L9.2 C10.L2.2 C10.L5.2 C10.L7.2 C10.L9.2 C11.L2.2 C11.L5.2 C11.L7.2 C11.L9.2 C12.L2.2 C12.L5.2 C12.L7.2 C12.L9.2 C13.L2.2 C13.L5.2 C13.L7.2 C13.L9.2 C14.L2.2 C14.L3.2 C14.L5.2 C15.L2.2 C15.L3.2 C15.L7.2 C15.L9.2 C16.L2.2 C16.L3.2 C16.L7.2 C16.L9.2 C17.L2.2 C17.L3.2 C17.L7.2 C17.L9.2 C18.L2.2 C18.L3.2 C19.L2.2 C19.L3.2 C20.L2.2 C20.L3.2 C21.L2.2 C21.L3.2 C22.L2.2 C22.L3.2 C23.L2.2 C23.L3.2 C24.L2.2 C24.L3.2 C25.L2.2 C25.L3.2 C26.L2.2 C26.L3.2 C27.L2.2 C27.L3.2 C28.L2.2 C28.L3.2 C29.L2.2 C29.L3.2 C30.L2.2 C30.L3.2 C31.L2.2 C31.L3.2 C32.L2.2 C32.L3.2 C33.L2.2 C33.L3.2 C34.L2.2 C34.L3.2 C35.L2.2 C36.L2.2 C37.L2.2 C38.L2.2 C39.L2.2 C40.L2.2 C41.L2.2 C42.L2.2 C43.L2.2 C44.L2.2 C45.L2.2 C46.L2.2 C47.L2.2 C48.L2.2 C49.L2.2 C50.L2.2 D1.L2.A8 D1.L2.A18 D1.L2.B1 D1.L2.B11 D1.L2.C4 D1.L2.C9 D1.L2.C14 D1.L2.D17 D1.L2.E10 D1.L2.E20 D1.L2.F3 D1.L2.F7 D1.L2.F10 D1.L2.G10 D1.L2.G12 D1.L2.G16 D1.L2.H7 D1.L2.H9 D1.L2.H11 D1.L2.H13 D1.L2.H19 D1.L2.J2 D1.L2.J8 D1.L2.J10 D1.L2.J12 D1.L2.K5 D1.L2.K7 D1.L2.K9 D1.L2.K10 D1.L2.K11 D1.L2.K13 D1.L2.K15 D1.L2.L8 D1.L2.L9 D1.L2.L10 D1.L2.L12 D1.L2.L18 D1.L2.M1 D1.L2.M7 D1.L2.M9 D1.L2.M10 D1.L2.M11 D1.L2.M13 D1.L2.N4 D1.L2.N8 D1.L2.N10 D1.L2.N12 D1.L2.N14 D1.L2.P7 D1.L2.P9 D1.L2.P11 D1.L2.P13 D1.L2.P17 D1.L2.R8 D1.L2.R12 D1.L2.R20 D1.L2.T3 D1.L2.T7 D1.L2.T13 D1.L2.U6 D1.L2.U16 D1.L2.V9 D1.L2.V19 D1.L2.W2 D1.L2.W12 D1.L2.Y5 D1.L2.Y15 D1.L3.1 D1.L4.3 D1.L5.2 D1.L6.2 D1.L6.11 D1.L6.Pad D1.L7.A9 D1.L7.B1 D1.L7.B3 D1.L7.B9 D1.L7.D1 D1.L7.D8 D1.L7.E1 D1.L7.E2 D1.L7.E8 D1.L7.F9 D1.L7.G1 D1.L7.G8 D1.L7.G9 D1.L7.J2 D1.L7.J8 D1.L7.M1 D1.L7.M9 D1.L7.P1 D1.L7.P9 D1.L7.T1 D1.L7.T9 D1.L9.A9 D1.L9.B1 D1.L9.B3 D1.L9.B9 D1.L9.D1 D1.L9.D8 D1.L9.E1 D1.L9.E2 D1.L9.E8 D1.L9.F9 D1.L9.G1 D1.L9.G8 D1.L9.G9 D1.L9.J2 D1.L9.J8 D1.L9.M1 D1.L9.M9 D1.L9.P1 D1.L9.P9 D1.L9.T1 D1.L9.T9 D2.L2.2 D2.L3.1 D2.L5.Pad D3.L2.4 D3.L3.1 D4.L2.2 D4.L3.1 R1.L4.2 R1.L6.1 R2.L2.1 R2.L4.2 R2.L7.1 R2.L9.1 R3.L4.2 R3.L7.1 R3.L9.1 R4.L2.1 R4.L4.2 R4.L8.1 R5.L7.1 R5.L9.1 R6.L2.1 R8.L5.2 R8.L8.1 R9.L3.2 R11.L3.1 R13.L3.1 R13.L5.2 R14.L2.2 R15.L3.1 R15.L5.2 R17.L2.2 R17.L3.1 R23.L2.1 R24.L2.1 R25.L2.1 R26.L2.1 R27.L2.1 R28.L2.1 R29.L2.1 R40.L2.2 R45.L2.1 R47.L2.1 SA1.L2.4 SA2.L2.4 VD1.L5.2 VD2.L3.2 VD2.L4.2 VT1.L2.2 VT1.L3.2 VT1.L8.2 VT2.L3.2 VT2.L8.2 VT3.L3.2 VT4.L3.2 X1.L4.1 X1.L4.12 X1.L4.13 X1.L5.4 X1.L5.5 X1.L5.6 X1.L6.6 X1.L6.10 X1.L6.11 X1.L6.12 X1.L6.13 X4.L1.1 X4.L1.3 X4.L1.5 X4.L1.7 X4.L1.9 X4.L1.11 X4.L1.13 X5.L1.29 X5.L1.30 X7.L1.29 X7.L1.30 X8.L1.27 X8.L1.28 X8.L1.29 X8.L1.30 X10.L1.3 X10.L1.4 ZQ1.L5.2 ZQ1.L5.4 | length 183.3
  Top Layer w0.15: v1@24.434,31.264 25.221,31.264 D1.L7.J2@25.62,30.865 ; v1(27.255,31.584) 27.569,31.27 30.015,31.27 D1.L7.J8@30.42,30.865 ; D1.L7.M9@31.22,28.465 34.566,28.465 v1(34.951,28.08)
  Top Layer w0.2: v1@24.025,29.26 D1.L7.M1@24.82,28.465 ; v1(24.42,25.665) D1.L7.T1@24.82,25.265 ; v1(24.42,27.265) D1.L7.P1@24.82,26.865 ; v1(24.42,32.865) D1.L7.G1@24.82,32.465 ; v1(24.42,34.465) D1.L7.E1@24.82,34.065 ; v1(24.42,35.265) D1.L7.E2@25.62,34.065 ; v1(24.42,36.865) D1.L7.B1@24.82,36.465 ; D1.L7.B3@26.42,36.465 v1(26.82,36.865) ; D1.L7.G8@30.42,32.465 D1.L7.G9@31.22,32.465 v1(31.62,32.865) D1.L7.F9@31.22,33.265 ; D1.L7.E8@30.42,34.065 v1(30.82,34.465) ; D1.L7.D8@30.42,34.865 v1(30.82,35.265) ; v1(30.82,27.265) D1.L7.P9@31.22,26.865 ; D1.L7.T9@31.22,25.265 v1(31.62,25.665) ; D1.L7.B9@31.22,36.465 v1(31.62,36.865) ; D1.L7.A9@31.22,37.265 31.222,37.265 v1(31.62,37.66) v1(31.62,37.66) ; v1(40.22,24.96) D1.L2.M1@41.42,26.16 ; v1@40.338,35.33 40.338,35.292 41.42,34.21 D1.L2.B1@41.42,34.16 ; v1(41.82,20.16) D1.L2.W2@42.22,20.56 ; v1(41.82,28.96) D1.L2.J2@42.22,28.56 ; v1(42.62,22.56) D1.L2.T3@43.02,22.96 ; v1(42.62,31.36) D1.L2.F3@43.02,30.96 ; v1(43.42,24.96) D1.L2.N4@43.82,25.36 ; v1(43.42,33.76) D1.L2.C4@43.82,33.36 ; v1(44.22,19.36) D1.L2.Y5@44.62,19.76 ; v1(44.22,28.16) D1.L2.K5@44.62,27.76 ; v1(45.02,21.76) D1.L2.U6@45.42,22.16 ; v1(45.82,22.56) D1.L2.T7@46.22,22.96 ; v1(45.82,24.16) D1.L2.P7@46.22,24.56 ; v1(45.82,25.76) D1.L2.M7@46.22,26.16 ; v1(45.82,28.16) D1.L2.K7@46.22,27.76 ; v1(45.82,29.76) D1.L2.H7@46.22,29.36 ; v1(45.82,31.36) D1.L2.F7@46.22,30.96 ; v1(46.62,23.36) D1.L2.R8@47.02,23.76 ; v1(46.62,24.96) D1.L2.N8@47.02,25.36 ; v1(46.62,26.56) D1.L2.L8@47.02,26.96 ; v1(46.62,28.96) D1.L2.J8@47.02,28.56 ; v1(46.62,35.36) D1.L2.A8@47.02,34.96 ; v1(47.42,20.96) D1.L2.V9@47.82,21.36 ; v1(47.42,24.16) D1.L2.P9@47.82,24.56 ; v1(47.42,25.76) D1.L2.M9@47.82,26.16 ; v1(47.42,26.56) D1.L2.L9@47.82,26.96 ; v1(47.42,28.16) D1.L2.K9@47.82,27.76 ; v1(47.42,29.76) D1.L2.H9@47.82,29.36 D1.L2.J10@48.62,28.56 ; v1(47.42,33.76) D1.L2.C9@47.82,33.36 ; v1(48.22,24.96) D1.L2.N10@48.62,25.36 ; v1(48.22,25.76) D1.L2.M10@48.62,26.16 ; v1(48.22,26.56) D1.L2.L10@48.62,26.96 ; v1(48.22,28.16) D1.L2.K10@48.62,27.76 ; v1(48.22,30.56) D1.L2.G10@48.62,30.16 ; v1(48.22,31.36) D1.L2.F10@48.62,30.96 ; v1(48.22,32.16) D1.L2.E10@48.62,31.76 ; D1.L2.P11@49.42,24.56 v1(49.82,24.16) ; D1.L2.M11@49.42,26.16 v1(49.82,25.76) ; D1.L2.K11@49.42,27.76 v1(49.82,28.16) ; D1.L2.H11@49.42,29.36 v1(49.82,29.76) ; D1.L2.B11@49.42,34.16 v1(49.82,34.56) ; D1.L2.W12@50.22,20.56 v1(50.62,20.96) ; D1.L2.R12@50.22,23.76 v1(50.62,23.36) ; D1.L2.N12@50.22,25.36 v1(50.62,24.96) ; D1.L2.L12@50.22,26.96 v1(50.62,26.56) ; D1.L2.J12@50.22,28.56 v1(50.62,28.96) ; D1.L2.G12@50.22,30.16 v1(50.62,30.56) ; D1.L2.T13@51.02,22.96 v1(51.42,22.56) ; D1.L2.P13@51.02,24.56 v1(51.42,24.16) ; D1.L2.M13@51.02,26.16 v1(51.42,25.76) ; D1.L2.K13@51.02,27.76 v1(51.42,28.16) ; D1.L2.H13@51.02,29.36 v1(51.42,29.76) ; D1.L2.N14@51.82,25.36 v1(52.22,24.96) ; D1.L2.C14@51.82,33.36 v1(52.22,33.76) ; D1.L2.Y15@52.62,19.76 v1(53.02,19.36) ; D1.L2.K15@52.62,27.76 v1(53.02,28.16) ; v1(53.02,29.76) D1.L2.G16@53.42,30.16 ; D1.L2.U16@53.42,22.16 v1(53.82,21.76) ; D1.L2.P17@54.22,24.56 v1(54.62,24.16) ; D1.L2.D17@54.22,32.56 v1(54.62,32.96) ; D1.L2.L18@55.02,26.96 v1(55.42,26.56) ; D1.L2.A18@55.02,34.96 v1(55.42,35.36) ; D1.L2.V19@55.82,21.36 v1(56.22,20.96) ; D1.L2.H19@55.82,29.36 v1(56.22,29.76) ; D1.L2.R20@56.62,23.76 56.668,23.712 57.372,23.712 v1(57.82,24.16) ; D1.L2.E20@56.62,31.76 v1(57.02,32.16) ; v1(73.64,40.245) 74.12,40.725 D1.L9.P9@74.88,40.725 ; v1(74.48,39.445) D1.L9.M9@74.88,39.045 ; v1(74.48,42.645) D1.L9.T9@74.88,42.245 ; D1.L9.F9@74.83,34.245 D1.L9.G9@74.83,35.045 ; D1.L9.A9@74.84,30.245 D1.L9.B9@74.84,31.045 ; D1.L9.A9@74.88,30.245 v1(75.28,29.845) ; D1.L9.G9@74.88,35.045 v1(75.28,35.445) ; v1(75.28,33.845) D1.L9.E8@75.68,33.445 D1.L9.D8@75.68,32.645 ; D1.L9.G8@75.68,35.045 v1(76.08,34.645) ; D1.L9.J8@75.68,36.645 v1(76.08,36.245) ; v1@78.518,29.883 D1.L9.B3@79.68,31.045 ; v1(80.08,36.245) D1.L9.J2@80.48,36.645 ; D1.L9.E2@80.48,33.445 v1(80.88,33.045) ; v1(80.88,30.645) D1.L9.B1@81.28,31.045 ; D1.L9.D1@81.28,32.645 v1(81.68,33.045) ; D1.L9.E1@81.28,33.445 v1(81.68,33.845) ; D1.L9.G1@81.28,35.045 v1(81.68,35.445) ; D1.L9.M1@81.28,39.045 v1(81.68,38.645) ; D1.L9.P1@81.28,40.645 v1(81.68,40.245) ; D1.L9.T1@81.28,42.245 v1(81.68,41.845) ; v1(108.551,40.899) v1@108.56,40.908
  Top Layer w0.3: v1(2.32,21.982) VD1.L5.2@2.32,22.74 ; D1.L4.3@11.94,8.35 v1(13.495,8.35) ; 16.92,25.17 17.36,25.61 R13.L5.2@18.23,25.61 ; R1.L6.1@18.47,51.18 v1(19.53,51.18) ; D1.L6.2@19.76,54.63 D1.L6.Pad@19.76,55.53 ; D1.L6.Pad@21.18,57.28 D1.L6.11@22.41,57.28 ; v1(33.89,43.46) 33.89,45.529 35.205,46.844 35.205,46.855 35.405,47.055 SA1.L2.4@35.805,47.055 ; C24.L2.2@36.94,25.21 C24.L2.2@36.94,25.26 ; C24.L2.2@37.099,24.901 37.722,24.277 39.537,24.277 v1(40.22,24.96) ; C10.L2.2@41.491,10.47 41.491,11.802 42.489,12.8 v1(44.029,12.8) ; v1@44.08,12.1 C28.L2.2@45.259,12.1 ; v1(47.4,9.43) 49.24,11.27 C44.L2.2@49.24,15.38
  Top Layer w0.4: v1(16.708,38.808) C9.L7.2@18.03,38.808 ; v1(16.75,36.15) C5.L7.2@18.202,36.15 ; v1(43.87,18.71) 44.618,18.71 45.26,18.068 C25.L2.2@45.26,16.9
  Top Layer w0.508: C2.L4.2@10.78,13.93 v1@10.78,19.03 ; X1.L5.4@12.06,32.245 13.79,32.245 14.46,31.575 C12.L5.2@14.46,30.45 ; v1(95.48,26.296) R15.L3.1@97.034,26.296 ; R9.L3.2@96.03,32.555 v1(96.03,34.109) ; v1@97.515,27.994 D3.L3.1@98.136,27.994 ; v1(103.697,4.605) D4.L3.1@103.696,5.266 ; v1(104.54,3.29) v1(105.187,3.29) ; v1(108.551,40.899) D1.L3.1@108.55,41.64 ; v1(109.6,40.61) v1(110.247,40.61) ; v1(111.423,23.38) v1(112.07,23.38) ; v1(112.156,28.445) D2.L3.1@112.154,29.126
  Top Layer w0.7: v1(11.99,57.89) X1.L6.6@14.725,57.89 ; C25.L2.2@45.26,16.9 C31.L2.2@47.163,16.9 ; v2(103.655,28.48) C5.L3.2@103.655,30.62
  Bottom Layer w0.2: C3.L2.1@59.07,25.18 cw(c59.07,24.97) C3.L2.1@59.219,25.119
  Bottom Layer w0.3: C3.L6.2@13.91,47.61 C3.L6.2@14.04,47.48 ; R8.L5.2@15.99,33.64 v1(15.99,36.7) v1@15.99,36.708 ; v1(41.23,15.61) 43.33,15.61 C27.L2.2@43.37,15.65 ; C3.L2.1@58.749,25.09 59.247,25.09 C3.L2.1@59.219,25.118 ; C2.L2.1@59.055,29.986 C2.L2.1@59.071,29.97 ; C33.L2.2@64.27,43.665 C33.L2.2@64.555,43.38 ; C35.L2.2@66.426,43.38 C35.L2.2@66.719,43.673 ; C9.L9.2@78.05,26.278 v1(79.141,26.278) ; C1.L9.2@79.82,26.294 v1(81.082,26.294) ; v1@82.68,43.322 R2.L9.1@82.68,44.38 ; R4.L8.1@94.44,13.97 R4.L8.1@94.63,13.78
  Bottom Layer w0.4: v1@12.67,49.649 C2.L6.2@14.07,49.649 ; v1@12.67,51.82 C4.L6.2@14.07,51.82 ; v1(12.685,47.61) C3.L6.2@13.91,47.61 ; ZQ1.L5.2@19.556,29.355 ZQ1.L5.4@19.556,32.038 ; v1(57.494,30.788) 58.296,29.986 C2.L2.1@59.055,29.986 ; v1@57.804,24.146 C3.L2.1@58.749,25.09 ; v1(62.87,43.93) 63.208,43.592 C33.L2.2@64.322,43.592 ; C35.L2.2@66.659,43.598 67.518,43.598 v1@68.09,44.17 ; C17.L9.2@78.05,41.24 v1(78.05,43.611)
  Bottom Layer w0.508: C4.L5.2@18.57,17.88 C5.L5.2@20.73,17.88 20.7,17.85 20.7,15.77 C6.L5.2@20.67,15.74 ; ZQ1.L5.4@19.596,32.038 ZQ1.L5.4@19.667,32.109 ZQ1.L5.4@19.737,32.18 ; C1.L2.2@40.562,22.454 40.668,22.56 v1(41.82,22.56) ; C14.L2.2@52.159,44.229 C14.L2.2@52.194,44.194 ; C47.L2.2@53.84,15.38 C40.L2.2@55.42,15.38 ; C4.L2.2@55.732,13.61 C40.L2.2@55.732,15.38 ; R8.L8.1@75.76,13.97 75.94,13.79 VT2.L8.2@75.94,12.41 75.94,12.36 76.086,12.214 76.136,12.214 77.09,11.26 v1@77.09,9.51 ; R4.L8.1@94.44,14.2 96.799,14.2 97.125,14.526 v1(97.125,15.58) ; R17.L2.2@94.62,37.63 94.62,37.68 94.816,37.876 94.917,37.876 v1(95.461,38.42) ; VT1.L8.2@94.63,12.41 R4.L8.1@94.63,13.78
  Bottom Layer w0.7: C42.L2.2@39.042,18.75 C41.L2.2@39.042,20.604 ; C49.L2.2@52.09,15.38 C47.L2.2@53.84,15.38
  other v1: 115.695,3.374 116.37,3.38 117.405,3.374 14.37,3.67 16.52,3.66 94.17,3.765 97.385,3.765 12.36,3.88 61.345,3.952 63.22,3.94 7.78,4.87 8.375,4.87 8.98,4.87 23.23,4.994 21.9,5.002 103.045,5.23 103.692,5.23 12.37,5.73 13.507,7.806 3.46,8.6 72.21,9.252 77.09,9.52 77.09,10.07 72.22,10.392 3.46,10.45 34.51,10.47 86.73,10.594 88.2,10.594 91.61,10.586 7.78,11.27 8.375,11.27 8.98,11.27 115.765,11.454 116.59,11.46 117.425,11.454 44.029,12.101 63.94,13.111 108.174,14.31 100.629,14.75 63.94,14.98 97.125,15.03 108.18,15.145 54.05,15.373 54.609,15.373 100.635,15.375 20.355,15.41 39.63,15.61 41.765,15.61 100.629,15.97 108.174,15.97 20.749,16.03 34.54,16.74 63.94,16.84 10.79,18.32 60.62,18.71 63.94,18.71 37.27,18.75 10.787,19.017 2.32,19.12 39.042,19.4 109.964,19.915 117.869,19.915 39.042,19.955 37.27,20.48 60.636,20.57 109.97,20.75 117.875,20.75 24.834,20.91 2.32,20.98 109.964,21.575 117.869,21.575 24.834,21.8 14.25,22.45 15.5,22.45 16.75,22.45 23.39,23.5 14.25,23.7 15.5,23.7 16.75,23.7 14.25,24.95 15.5,24.95 16.75,24.95 23.24,25.56 107.76,26 9.35,26.06 96.127,26.296 8.71,26.77 97.515,27.993 98.1,27.998 84.859,28.233 98.1,28.645 111.503,29.09 112.15,29.09 107.76,29.2 24.03,29.265 78.5,29.845 84.855,30.06 24.42,31.264 84.855,31.93 96.03,33.462 23.24,34.89 4.95,35.33 40.308,35.36 84.855,35.67 17.44,36.15 109.959,37.155 117.834,37.155 8.24,37.34 8.93,37.34 9.68,37.34 94.43,37.422 16.48,37.47 109.965,37.99 117.84,37.99 118.545,37.996 5.74,38.27 37.76,38.43 34.01,38.755 34.7,38.755 109.959,38.815 117.834,38.815 40.543,39.206 42.427,39.206 44.26,39.35 84.855,39.4 55.158,39.865 89.73,40.62 5.55,40.8 84.855,41.249 4.95,41.48 107.899,41.604 108.546,41.604 54.583,41.705 63.481,41.854 95.461,42.108 25.26,42.315 30.75,42.315 32.61,42.525 23.19,42.785 61.136,42.911 5.55,42.98 61.63,43.19 41.876,43.286 82.677,43.3 61.132,43.53 4.95,43.66 37.852,43.871 68.1,44.187 70.771,44.9 71.49,44.9 100.639,45.01 70.771,45.518 71.49,45.518 100.645,45.845 75.68,46.03 95.462,46.532 100.639,46.67 3.795,47.09 49.513,47.173 49.513,47.774 12.66,49.649 95.2,50.02 12.66,51.82 26.1,52.862 23.37,52.88 24.09,52.88 24.672,55.249 26.09,55.305 19.58,55.59 20.51,55.59 21.44,55.59 26.09,56.346 24.68,56.354 19.58,56.53 20.51,56.53 21.44,56.53 19.57,57.46 20.51,57.46 21.45,57.46 12.67,57.89 13.35,57.89 22.784,58.582 26.09,58.75 20.999,59.239 3.795,62.67 12.925,62.82 17.558,63.06 20.855,63.06 24.152,63.06
  other v2: 113.04,3.45 101.125,10.8 103.3,10.8 110.88,15.81 101.555,17.975 107.52,17.975 110.88,17.975 107.52,20.125 107.52,22.265 113.255,23.5 109.73,34.655 111.885,34.655 117.84,45.215 106.064,47.154 108.189,47.154 110.355,49.125 116.225,49.125
INIT_B_0: D1.L2.R10 R38.L2.2 | length 10.4
  Top Layer w0.1: R38.L2.2@43.581,17.148 43.627,17.193 43.627,17.737 v1(43.87,17.98)
  Top Layer w0.2: v1(48.22,23.36) D1.L2.R10@48.62,23.76
  Middle Layer 3 w0.1: v1(43.87,17.98) 46.802,17.98 47.814,18.992 47.814,22.954 v1(48.22,23.36)
IO_L22N_T3_13: D1.L2.W6 R46.L2.2 R47.L2.2 | length 67
  Top Layer w0.2: v1(45.02,20.16) D1.L2.W6@45.42,20.56
  Top Layer w0.3: v1(93.11,41.26) 94.24,40.13 R47.L2.2@95.211,40.13
  Middle Layer 4 w0.1: v1(45.02,20.16) 45.411,20.551 59.339,20.551 60.03,19.86 63.9,19.86 65.66,18.1 77.984,18.1 93.48,33.596 93.48,40.89 v1(93.11,41.26)
IO_L22P_T3_13: D1.L2.V6 R44.L2.2 R45.L2.2 | length 68.4
  Top Layer w0.2: v1(45.02,20.96) D1.L2.V6@45.42,21.36
  Top Layer w0.3: v1(93.11,43.2) 94.981,43.2 R45.L2.2@95.211,43.43
  Middle Layer 4 w0.1: v1(45.02,20.96) 45.03,20.96 45.442,21.372 62.99,21.372 65.902,18.46 77.836,18.46 93.124,33.748 93.124,40.206 92.626,40.704 92.626,42.716 v1(93.11,43.2)
  Bottom Layer w0.3: R44.L2.2@93.1,43.21 v1(93.11,43.2)
LDM: D1.L2.Y16 D1.L9.E7 | length 37.6
  Top Layer w0.1: D1.L2.Y16@53.42,19.76 v1(53.82,19.36) ; v1(76.08,33.845) D1.L9.E7@76.48,33.445
  Middle Layer 2 w0.1: v1(53.82,19.36) 54.619,20.159 cw(c54.904,19.874) 54.904,20.277 55.763,20.277 ccw(c55.763,20.711) 56.069,20.404 cw(c56.412,20.062) 56.412,20.546 57.02,20.546 ccw(c57.02,21.285) 57.542,20.762 59.186,22.406 ccw(c57.467,24.128) 59.9,24.128 ; 59.9,24.129 59.9,24.657 cw(c62.44,24.657) 60.51,26.308 cw(c62.44,24.657) 60.543,26.346 60.644,26.453 60.823,26.632 cw(c60.964,26.49) 61.106,26.632 61.162,26.575 ccw(c61.304,26.717) 61.445,26.575 ccw(c61.304,26.717) 61.445,26.858 61.241,27.062 cw(c61.382,27.204) 61.241,27.345 cw(c61.382,27.204) 61.524,27.345 61.691,27.178 ccw(c61.832,27.32) 61.974,27.178 ccw(c61.832,27.32) 61.974,27.461 61.954,27.48 cw(c62.096,27.622) 61.954,27.763 62.481,28.29 63.534,29.343 cw(c64.13,28.748) 64.13,29.59 ccw(c64.13,30.701) 64.915,29.915 69.11,34.11 cw(c69.432,33.789) 69.432,34.244 69.457,34.244 69.907,34.244 cw(c69.907,34.044) 70.107,34.044 70.107,33.858 ccw(c70.307,33.858) 70.507,33.858 70.507,34.218 cw(c70.707,34.218) 70.907,34.218 70.907,33.858 ccw(c71.107,33.858) 71.307,33.858 71.307,34.218 cw(c71.507,34.218) 71.707,34.218 71.707,33.858 ccw(c71.907,33.858) 72.107,33.858 72.107,34.218 cw(c72.307,34.218) 72.507,34.218 72.507,33.858 ccw(c72.707,33.858) 72.907,33.858 72.907,34.218 cw(c73.107,34.218) 73.307,34.218 73.307,33.99 ccw(c73.507,33.99) 73.707,33.99 73.707,34.044 cw(c73.907,34.044) 73.907,34.244 74.72,34.244 75.526,34.244 cw(c75.526,33.868) 75.791,34.134 v1(76.08,33.845)